# Altium PCB Saleem_PCB.PcbDoc (part 2 of 3)
Units mil, origin at the board's own origin, x right, y up, seen from the top; angles counter-clockwise.
Board outline 2705.54 x 1767 mil, 2 copper layers (Top Layer, Bottom Layer); 91 components, 66 nets, 321 pads, 111 vias.
Unrouted connection lines stored in the file: 1.
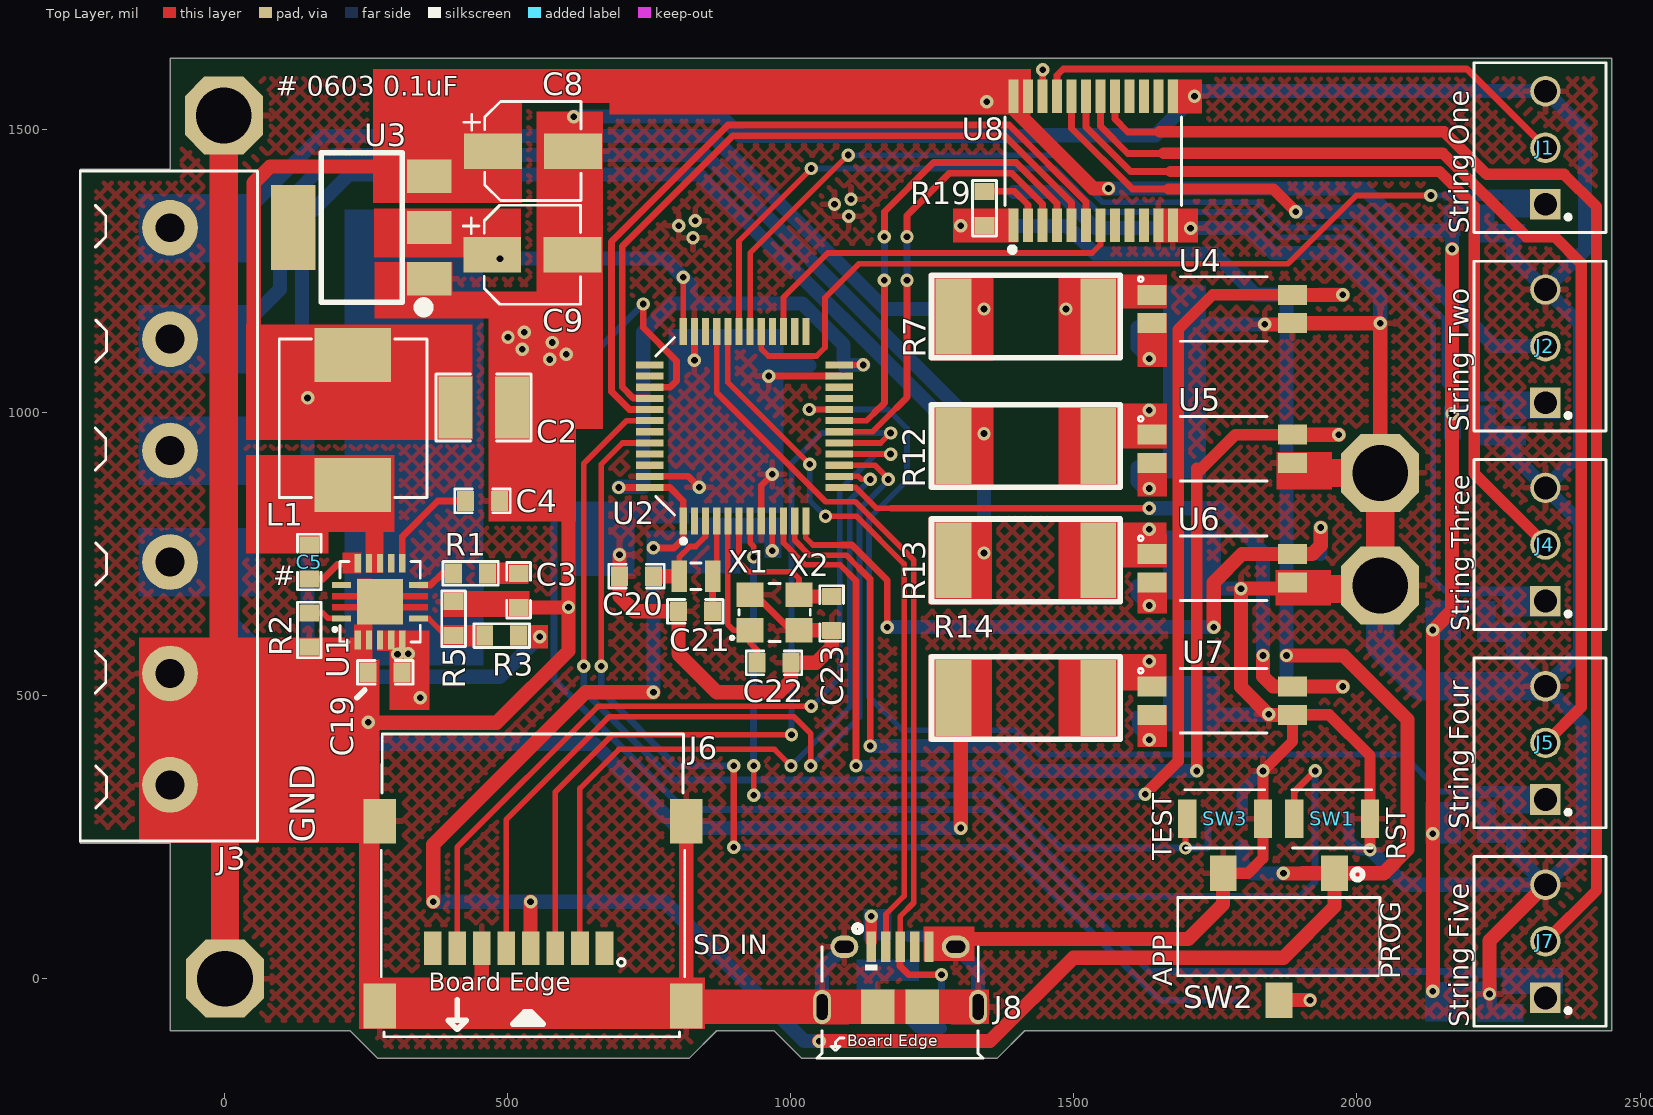
[diagram p0: Top Layer view]

## Part data (continued)
R4 R5 R6 R19 R20: library part RC0603FR-0710KL, "RES SMD 10K OHM 1% 1/10W 0603", Case/Package=0603, Case Code (Metric)=1608, Manufacturer=Yageo, Max Operating Temperature=155°C, Min Operating Temperature=-55°C, Power Rating=100mW, Resistance=10kR, Supplier Part Number 1=311-10.0KHRDKR-ND, Temperature Coefficient=100ppm/°C, Tolerance=1%, Voltage Rating=75V, Voltage Rating (DC)=50V, Case Code (Imperial)=0603, ComponentLink1Description=http://www.farnell.com/datasheets/38590.pdf?src-supplier=Element14, ComponentLink1URL=http://www.farnell.com/datasheets/38590.pdf?src-supplier=Element14, ComponentLink2Description=https://www.verical.com/server-webapp/html/getDatasheet?partID=409289&src-supplier=Verical, ComponentLink2URL=https://www.verical.com/server-webapp/html/getDatasheet?partID=409289&src-supplier=Verical, ComponentLink3Description=http://www.farnell.com/datasheets/1868787.pdf?src-supplier=Element14, ComponentLink3URL=http://www.farnell.com/datasheets/1868787.pdf?src-supplier=Element14, ComponentLink4Description=http://www.farnell.com/datasheets/2167052.pdf?src-supplier=Element14, ComponentLink4URL=http://www.farnell.com/datasheets/2167052.pdf?src-supplier=Element14, ComponentLink5Description=http://www.farnell.com/datasheets/443971.pdf?src-supplier=Element14, ComponentLink5URL=http://www.farnell.com/datasheets/443971.pdf?src-supplier=Element14, Composition="Thick Film", Depth=0.8mm, Height=0.45mm, Lead Free="Lead Free", Lead Pitch=0.3mm, Length=1.6mm, Manufacturer Part Number=RC0603FR-0710KL, Military Standard=Not, Number of Pins=2, Packaging="Tape and Reel", Pricing 1="1=0.1, 10=0.024, 100=0.0097, 1000=0.00437, 2500=0.00379 (USD)", REACH SVHC="No SVHC", Stock 1=144725424, Supplier 1=Digi-Key, Termination=SMD/SMT, Weight=7.1E-05oz, Width=0.8mm
R7 R12 R13 R14: library part 25121WF3900T4E, "Resistors 200V 390O 2512 Chip Resistor SMD", Manufacturer=UNI-ROYAL, Package=2512, ComponentLink1Description=LCSC, ComponentLink1URL=https://lcsc.com/product-detail/Chip-span-style-background-color-ff0-Resistor-span-Surface-Mount_UNI-ROYAL-Uniroyal-Elec-25121WF3900T4E_C60131.html, Manufacturer Part No=25121WF3900T4E
R8 R9 R10 R11: library part RC0603FR-073K3L, "RES SMD 3.3K OHM 1% 1/10W 0603", Case/Package=0603, Manufacturer="Yageo Phycomp", Max Operating Temperature=155°C, Min Operating Temperature=-55°C, Power Rating=100mW, Resistance=3.3kR, Supplier Part Number 1=311-3.30KHRCT-ND, Temperature Coefficient=100ppm/°C, Tolerance=1%, Voltage Rating (DC)=50V, Depth=0.8mm, Height=0.45mm, Lead Free="Lead Free", Length=1.6mm, Manufacturer Part Number=RC0603FR-073K3L, Mount="Surface Mount", Number of Pins=2, Packaging="Cut Tape", Pricing 1="1=0.1, 10=0.024, 100=0.0097, 1000=0.00437, 2500=0.00379 (USD)", REACH SVHC="No SVHC", Stock 1=6863000, Supplier 1=Digi-Key, Width=800um
R15 R16 R17 R18: library part RT0603DRD07200RL, "RES SMD 200 OHM 0.5% 1/10W 0603", Case/Package=0603, Manufacturer=Yageo, Power Rating=100mW, Supplier Part Number 1=311-200DCT-ND, Tolerance=0.5%, Voltage Rating (DC)=50V, Lead Free="Lead Free", Manufacturer Part Number=RT0603DRD07200RL, Packaging="Cut Tape", Pricing 1="1=0.21, 10=0.174, 100=0.0682, 1000=0.02855, 2500=0.02617 (USD)", Resistance=200R, Stock 1=19572, Supplier 1=Digi-Key
R21: library part RC0603FR-0736KL, "RES SMD 36K Ohm 1% 0.1W 0603", Case/Package=0603, Case Code (Metric)=1608, Manufacturer=Yageo, Max Operating Temperature=155°C, Max Power Dissipation=100mW, Min Operating Temperature=-55°C, Package Quantity=1, Resistance=36kR, Resistor Type="Thick Film", Supplier Part Number 1=311-36.0KHRCT-ND, Temperature Coefficient=100ppm/°C, Tolerance=1%, Voltage Rating=75V, Voltage Rating (DC)=50V, Case Code (Imperial)=0603, Category="Chip SMD Resistors", ComponentLink1Description=https://datasheet.ciiva.com/2454/pyu-r-int-thick-7-2454483.pdf?src-supplier=Digi-Key, ComponentLink1URL=https://datasheet.ciiva.com/2454/pyu-r-int-thick-7-2454483.pdf?src-supplier=Digi-Key, ComponentLink2Description=https://datasheet.ciiva.com/2454/pyu-r-int-thick-7-2454484.pdf?src-supplier=Digi-Key, ComponentLink2URL=https://datasheet.ciiva.com/2454/pyu-r-int-thick-7-2454484.pdf?src-supplier=Digi-Key, ComponentLink3Description=https://datasheet.ciiva.com/2454/pyu-r-int-thick-7-2454485.pdf?src-supplier=Digi-Key, ComponentLink3URL=https://datasheet.ciiva.com/2454/pyu-r-int-thick-7-2454485.pdf?src-supplier=Digi-Key, Construction=Rectangular, Depth=0.8mm, Features="Moisture Resistant", Height=0.022inch, Lead Free="Lead Free", Length=1.6mm, Manufacturer Part Number=RC0603FR-0736KL, Military Standard=Not, Mount="Surface Mount", Number of Terminations=2, Packaging="Tape and Reel", Power Rating=100mW, Pricing 1="1=0.10000, 10=0.02400, 100=0.00970, 1000=0.00436, 2500=0.00378 (USD)", RoHS=Yes, RoHS Compliant=Yes, Series=RC, Size Code=0603, Stock 1=463498, Supplier 1=Digi-Key, Termination=SMD/SMT, Weight=7.1E-05oz, Width=0.031inch
R22: library part RC0603FR-071K5L, "RES SMD 1.5K OHM 1% 1/10W 0603"
R23: library part RC0603FR-0710KL, "RES SMD 10K OHM 1% 1/10W 0603", Case Code (Imperial)=0603, Case Code (Metric)=1608, Manufacturer=Yageo, Max Operating Temperature=155°C, Min Operating Temperature=-55°C, Power Rating=100mW, Resistance=10kR, Supplier Part Number 1=311-10.0KHRDKR-ND, Temperature Coefficient=100ppm/°C, Tolerance=1%, Voltage Rating=75V, Voltage Rating (DC)=50V, Case/Package=0603, ComponentLink1Description=http://www.farnell.com/datasheets/38590.pdf?src-supplier=Element14, ComponentLink1URL=http://www.farnell.com/datasheets/38590.pdf?src-supplier=Element14, ComponentLink2Description=https://www.verical.com/server-webapp/html/getDatasheet?partID=409289&src-supplier=Verical, ComponentLink2URL=https://www.verical.com/server-webapp/html/getDatasheet?partID=409289&src-supplier=Verical, ComponentLink3Description=http://www.farnell.com/datasheets/1868787.pdf?src-supplier=Element14, ComponentLink3URL=http://www.farnell.com/datasheets/1868787.pdf?src-supplier=Element14, ComponentLink4Description=http://www.farnell.com/datasheets/2167052.pdf?src-supplier=Element14, ComponentLink4URL=http://www.farnell.com/datasheets/2167052.pdf?src-supplier=Element14, ComponentLink5Description=http://www.farnell.com/datasheets/443971.pdf?src-supplier=Element14, ComponentLink5URL=http://www.farnell.com/datasheets/443971.pdf?src-supplier=Element14, Composition="Thick Film", Depth=0.8mm, Height=0.45mm, Lead Free="Lead Free", Lead Pitch=0.3mm, Length=1.6mm, Manufacturer Part Number=RC0603FR-0710KL, Military Standard=Not, Number of Pins=2, Packaging="Tape and Reel", Pricing 1="1=0.1, 10=0.024, 100=0.0097, 1000=0.00437, 2500=0.00379 (USD)", REACH SVHC="No SVHC", Stock 1=144725424, Supplier 1=Digi-Key, Termination=SMD/SMT, Weight=7.1E-05oz, Width=0.8mm
SW1 SW3: "SWITCH TACTILE SPST-NO 0.05A 12V", Contact Current Rating=50mA, Contact Resistance=100mR, Insulation Resistance=100MR, Manufacturer=Omron, Max Operating Temperature=70°C, Max Voltage Rating (DC)=12V, Min Operating Temperature=-25°C, Operating Force=1.5N, Package Quantity=1, Ratings="Dust Proof,IP40", Supplier Part Number 1=SW1020DKR-ND, Actuator Length=0.4mm, Actuator Type=Standard, ComponentLink1Description=http://www.farnell.com/datasheets/60838.pdf?src-supplier=Farnell, ComponentLink1URL=http://www.farnell.com/datasheets/60838.pdf?src-supplier=Farnell, ComponentLink2Description=http://www.farnell.com/datasheets/60838.pdf?src-supplier=Element14, ComponentLink2URL=http://www.farnell.com/datasheets/60838.pdf?src-supplier=Element14, ComponentLink3Description=https://omronfs.omron.com/en_US/ecb/products/pdf/en-b3u.pdf?src-supplier=Digi-Key, ComponentLink3URL=https://omronfs.omron.com/en_US/ecb/products/pdf/en-b3u.pdf?src-supplier=Digi-Key, ComponentLink4Description=http://www.omron.com/ecb/products/pdf/en-b3u.pdf?src-supplier=Digi-Key, ComponentLink4URL=http://www.omron.com/ecb/products/pdf/en-b3u.pdf?src-supplier=Digi-Key, ComponentLink5Description=https://www.distrelec.biz/Web/Downloads/he/et/B3U_eng_datasheet.pdf?mime=application%2Fpdf&src-supplier=Distrelec, ComponentLink5URL=https://www.distrelec.biz/Web/Downloads/he/et/B3U_eng_datasheet.pdf?mime=application%2Fpdf&src-supplier=Distrelec, ComponentLink6Description=http://www.onlinecomponents.com/productFiles/mf-OM/en-b3u.pdf?src-supplier=Onlinecomponents.com, ComponentLink6URL=http://www.onlinecomponents.com/productFiles/mf-OM/en-b3u.pdf?src-supplier=Onlinecomponents.com, ComponentLink7Description=https://www.verical.com/server-webapp/html/getDatasheet?partID=552554&src-supplier=Verical, ComponentLink7URL=https://www.verical.com/server-webapp/html/getDatasheet?partID=552554&src-supplier=Verical, ComponentLink8Description=http://www.farnell.com/datasheets/1685550.pdf?src-supplier=Element14, ComponentLink8URL=http://www.farnell.com/datasheets/1685550.pdf?src-supplier=Element14, ComponentLink9Description=http://www.farnell.com/datasheets/2610940.pdf?src-supplier=Farnell, ComponentLink9URL=http://www.farnell.com/datasheets/2610940.pdf?src-supplier=Farnell, ComponentLink10Description=https://www.alliedelec.com/m/d/4c8a9ef82804fc3c241a13c1e298fd73.pdf?src-supplier=Allied+Electronics, ComponentLink10URL=https://www.alliedelec.com/m/d/4c8a9ef82804fc3c241a13c1e298fd73.pdf?src-supplier=Allied+Electronics, Contact Material=Silver, Current Rating=50mA, Depth=2.5mm, Electrical Life=200000Cycles, Height=1.2mm, Illumination Type=Non-Illuminated,Illuminated, Lead Free="Lead Free", Length=4mm, Manufacturer Part Number=B3U-1000P, Max Current Rating=50mA, Mechanical Life=200000Cycles, Mount="Surface Mount", Orientation=Straight, Packaging="Tape and Reel", Pricing 1="1=1, 10=0.961, 25=0.9064, 50=0.7976, 100=0.7251, 250=0.68888, 500=0.67074, 1000=0.52571 (USD)", REACH SVHC=Unknown, Stock 1=116454, Supplier 1=Digi-Key, Switch Function=Off-Mom, Switch Travel=0.15mm, Termination=SMD/SMT, Throw Configuration=SPST, Voltage Rating (DC)=12V, Weight=0.000776oz, Width=3mm
SW2: "SPDT 50mA @ 12VDC 12V On-On SMD Toggle Switches RoHS", Contact Rating @ Voltage="50mA @ 12VDC", Manufacturer="XKB Connectivity", Operating Force=200±100gf, Package=SMD, Rated Voltage(DC)=12V, Actuator Orientation=Vertical, Actuator Type=Standard, Circuit=SPDT, Contact Finish=Silver, Contact Material=Brass, Electrical Life Cycles=10000, Mounting Type="Surface Mount", Switch Height=3mm
U1: "IC REG BUCK ADJUSTABLE 6A 14VQFN", Case/Package=QFN, Manufacturer="Texas Instruments", Max Input Voltage=17V, Max Operating Temperature=150°C, Max Output Current=6A, Max Output Voltage=15V, Min Input Voltage=1.6V, Min Operating Temperature=-40°C, Min Output Voltage=800mV, Min Supply Voltage=4.5V, Package Quantity=3000, Quiescent Current=600uA, Supplier Part Number 1=296-28831-1-ND, Switching Frequency=1.6MHz, Category="Voltage Regulators - Switching", ComponentLink1Description=https://datasheet.ciiva.com/2026/tps54620-2026364.pdf?src-supplier=Digi-Key, ComponentLink1URL=https://datasheet.ciiva.com/2026/tps54620-2026364.pdf?src-supplier=Digi-Key, ComponentLink2Description=https://datasheet.ciiva.com/22716/1781687-22716300.pdf?src-supplier=Element14, ComponentLink2URL=https://datasheet.ciiva.com/22716/1781687-22716300.pdf?src-supplier=Element14, ComponentLink3Description=https://datasheet.ciiva.com/2026/tps54620-2026365.pdf?src-supplier=Digi-Key, ComponentLink3URL=https://datasheet.ciiva.com/2026/tps54620-2026365.pdf?src-supplier=Digi-Key, ComponentLink4Description=https://datasheet.ciiva.com/26101/tps54620-26101515.pdf?src-supplier=Avnet+Europe, ComponentLink4URL=https://datasheet.ciiva.com/26101/tps54620-26101515.pdf?src-supplier=Avnet+Europe, ComponentLink5Description=https://datasheet.ciiva.com/3221/tps54620-3221357.pdf?src-supplier=Avnet, ComponentLink5URL=https://datasheet.ciiva.com/3221/tps54620-3221357.pdf?src-supplier=Avnet, ComponentLink6Description=https://datasheet.ciiva.com/2026/tps54620-2026366.pdf?src-supplier=Digi-Key, ComponentLink6URL=https://datasheet.ciiva.com/2026/tps54620-2026366.pdf?src-supplier=Digi-Key, Contact Plating=Gold, Height=0.95mm, Lead Free="Lead Free", Length=3.65mm, Manufacturer Part Number=TPS54620RHLR, Mount="Surface Mount", Number of Outputs=1, Number of Pins=14, Operating Supply Voltage=17V, Output Current=6A, Output Type=Adjustable, Output Voltage=15V, Packaging="Tape and Reel", Pricing 1="1=5.80000, 10=5.20700, 25=4.92280, 100=4.26630, 250=4.04752, 500=3.63182, 1000=3.61200 (USD)", Radiation Hardening=No, REACH SVHC="No SVHC", RoHS=Yes, RoHS Compliant=Yes, Series=SWIFT™, Supplier 1=Digi-Key, Synchronous Rectifier=Yes, Width=3.65mm
U2: Case/Package=LQFP, Frequency=48MHz, Manufacturer=STMicroelectronics, Max Operating Temperature=85°C, Min Operating Temperature=-40°C, Supplier Part Number 1=497-18745-6-ND, Category=Microcontrollers, ComponentLink1Description=http://www.mouser.com/ds/2/389/stm32f070c6-956182.pdf?src-supplier=Mouser, ComponentLink1URL=http://www.mouser.com/ds/2/389/stm32f070c6-956182.pdf?src-supplier=Mouser, ComponentLink2Description=http://www.st.com/content/ccc/resource/technical/document/datasheet/31/4f/10/5f/a5/32/46/42/DM00141386.pdf/files/DM00141386.pdf/jcr:content/translations/en.DM00141386.pdf?src-supplier=Digi-Key, ComponentLink2URL=http://www.st.com/content/ccc/resource/technical/document/datasheet/31/4f/10/5f/a5/32/46/42/DM00141386.pdf/files/DM00141386.pdf/jcr:content/translations/en.DM00141386.pdf?src-supplier=Digi-Key, Core Architecture=ARM, Interface=I2C,SPI,USB,UART,USART, Lead Free="Lead Free", Manufacturer Part Number=STM32F070CBT6TR, Memory Size=128KB, Memory Type=FLASH, Number of I/Os=37, Oscillator Type=Internal, Packaging="Tape and Reel", Peripherals=POR,PWM,WDT,DMA, Pricing 1="1=3.40000, 10=3.05100, 25=2.87800, 100=2.45200, 250=2.30232, 500=2.01452, 1000=1.91860 (USD)", RoHS=Yes, RoHS Compliant=Yes, Supplier 1=Digi-Key
U3: "IC REG LINEAR 3.3V 1A SOT223", Case/Package=SOT-223, Dropout Voltage=1.3V, Manufacturer="ON Semiconductor", Max Input Voltage=18V, Max Operating Temperature=125°C, Max Output Current=1A, Min Current Limit=1.1A, Min Input Voltage=-300mV, Min Operating Temperature=0°C, Min Output Voltage=3.3V, Package Quantity=1, Power Supply Rejection Ratio (PSRR)=60dB, Quiescent Current=700uA, Reference Voltage=1.275V, Supplier Part Number 1=NCP1117LPST33T3GOSCT-ND, Category="Voltage Regulators - Linear", ComponentLink1Description=https://datasheet.ciiva.com/6590/ncp1117lp-d-6590870.pdf?src-supplier=Digi-Key, ComponentLink1URL=https://datasheet.ciiva.com/6590/ncp1117lp-d-6590870.pdf?src-supplier=Digi-Key, ComponentLink2Description=https://datasheet.ciiva.com/16468/ncp1117lp-d-16468566.pdf?src-supplier=Future+Electronics, ComponentLink2URL=https://datasheet.ciiva.com/16468/ncp1117lp-d-16468566.pdf?src-supplier=Future+Electronics, ComponentLink3Description=https://datasheet.ciiva.com/6590/ncp1117lp-d-6590872.pdf?src-supplier=Digi-Key, ComponentLink3URL=https://datasheet.ciiva.com/6590/ncp1117lp-d-6590872.pdf?src-supplier=Digi-Key, ComponentLink4Description=https://datasheet.ciiva.com/6590/ncp1117lp-d-6590873.pdf?src-supplier=Digi-Key, ComponentLink4URL=https://datasheet.ciiva.com/6590/ncp1117lp-d-6590873.pdf?src-supplier=Digi-Key, ComponentLink5Description=https://datasheet.ciiva.com/8233/ncp1117lp-d-8233561.pdf?src-supplier=Avnet, ComponentLink5URL=https://datasheet.ciiva.com/8233/ncp1117lp-d-8233561.pdf?src-supplier=Avnet, ComponentLink6Description=https://datasheet.ciiva.com/8231/ncp1117lp-d-8231034.pdf?src-supplier=Avnet, ComponentLink6URL=https://datasheet.ciiva.com/8231/ncp1117lp-d-8231034.pdf?src-supplier=Avnet, ComponentLink7Description=https://datasheet.ciiva.com/4887/ncp1117lp-d-82673-4887580.pdf?src-supplier=Mouser, ComponentLink7URL=https://datasheet.ciiva.com/4887/ncp1117lp-d-82673-4887580.pdf?src-supplier=Mouser, Contact Plating=Tin,Matte, Halogen Free="Halogen Free", Height=1.69mm, Lead Free="Lead Free", Length=6.7mm, Manufacturer Part Number=NCP1117LPST33T3G, Mount="Surface Mount", Nominal Output Voltage=3.3V, Number of Outputs=1, Number of Pins=3, Number of Regulators=1, Output Current=1A, Output Type=Fixed, Output Voltage=3.3V, Packaging="Tape and Reel", Polarity=Positive, Pricing 1="1=0.44000, 10=0.37400, 25=0.34920, 100=0.27930, 250=0.25932, 500=0.21944, 1000=0.16957 (USD)", REACH SVHC="No SVHC", RoHS=Yes, RoHS Compliant=Yes, Series=-, Stock 1=2017, Supplier 1=Digi-Key, Width=3.7mm
U4 U5 U6 U7: "TransistorOptocouplers DC 1 2500Vrms SOP-4_P1.27 Optocouplers RoHS", Case/Package=SOIC, Collector Emitter Saturation Voltage=300mV, Forward Voltage=1.2V, Manufacturer=CEL, Max Collector Current=30mA, Max Operating Temperature=100°C, Max Output Voltage=80V, Max Power Dissipation=120mW, Min Operating Temperature=-55°C, Package Quantity=1, Supplier Part Number 1=PS2801C-1-F3-ACT-ND, Collector Emitter Voltage (VCEO)=300mV, ComponentLink1Description=http://www.cel.com/pdf/datasheets/PS2801C-1,PS2801C-4.pdf?src-supplier=Digi-Key, ComponentLink1URL=http://www.cel.com/pdf/datasheets/PS2801C-1,PS2801C-4.pdf?src-supplier=Digi-Key, ComponentLink2Description=http://www.cel.com/pdf/datasheets/how_to_order_optos.pdf?src-supplier=Digi-Key, ComponentLink2URL=http://www.cel.com/pdf/datasheets/how_to_order_optos.pdf?src-supplier=Digi-Key, ComponentLink3Description=http://datasheet.iiic.cc/cel/PS2801C-1-F3-A.pdf?src-supplier=IIIC, ComponentLink3URL=http://datasheet.iiic.cc/cel/PS2801C-1-F3-A.pdf?src-supplier=IIIC, Lead Free="Lead Free", Manufacturer Part Number=PS2801C-1-F3-A, Mount="Surface Mount", Number of Channels=1, Number of Pins=4, Output Current per Channel=30mA, Packaging="Tape and Reel", Pricing 1="1=0.77, 10=0.595, 100=0.3825 (USD)", Stock 1=399, Supplier 1=Digi-Key
U8: "IC TRANSLATION TXRX 5.5V 24TSSOP", Case/Package=TSSOP, High Level Output Current=-32mA, Low Level Output Current=32mA, Manufacturer="Texas Instruments", Max Operating Temperature=85°C, Max Supply Voltage=5.5V, Min Operating Temperature=-40°C, Min Supply Voltage=1.65V, Operating Supply Voltage=3.3V, Package Quantity=1, Quiescent Current=15uA, Supplier Part Number 1=296-18593-1-ND, Category="Buffers, Drivers and Transceivers", ComponentLink1Description=https://datasheet.ciiva.com/1899/sn74lvc8t245-ep-1899655.pdf?src-supplier=Digi-Key, ComponentLink1URL=https://datasheet.ciiva.com/1899/sn74lvc8t245-ep-1899655.pdf?src-supplier=Digi-Key, ComponentLink2Description=https://datasheet.ciiva.com/1628/1636538-1628674.pdf?src-supplier=Newark, ComponentLink2URL=https://datasheet.ciiva.com/1628/1636538-1628674.pdf?src-supplier=Newark, ComponentLink3Description=https://datasheet.ciiva.com/15086/getdatasheetpartid-299102-15086582.pdf?src-supplier=Verical, ComponentLink3URL=https://datasheet.ciiva.com/15086/getdatasheetpartid-299102-15086582.pdf?src-supplier=Verical, ComponentLink4Description=https://datasheet.ciiva.com/26868/sn74lvc8t245mpwrep-26868235.pdf?src-supplier=IIIC, ComponentLink4URL=https://datasheet.ciiva.com/26868/sn74lvc8t245mpwrep-26868235.pdf?src-supplier=IIIC, ComponentLink5Description=https://datasheet.ciiva.com/1899/sn74lvc8t245-ep-1899656.pdf?src-supplier=Digi-Key, ComponentLink5URL=https://datasheet.ciiva.com/1899/sn74lvc8t245-ep-1899656.pdf?src-supplier=Digi-Key, ComponentLink6Description=https://datasheet.ciiva.com/1899/sn74lvc8t245-ep-1899657.pdf?src-supplier=Digi-Key, ComponentLink6URL=https://datasheet.ciiva.com/1899/sn74lvc8t245-ep-1899657.pdf?src-supplier=Digi-Key, ComponentLink7Description=https://datasheet.ciiva.com/25972/sn74lvc8t245-ep-25972059.pdf?src-supplier=Avnet+Europe, ComponentLink7URL=https://datasheet.ciiva.com/25972/sn74lvc8t245-ep-25972059.pdf?src-supplier=Avnet+Europe, ComponentLink8Description=https://datasheet.ciiva.com/34301/1048559-34301923.pdf?src-supplier=Jameco, ComponentLink8URL=https://datasheet.ciiva.com/34301/1048559-34301923.pdf?src-supplier=Jameco, ComponentLink9Description=https://datasheet.ciiva.com/15086/getdatasheetpartid-48801-15086005.pdf?src-supplier=Verical, ComponentLink9URL=https://datasheet.ciiva.com/15086/getdatasheetpartid-48801-15086005.pdf?src-supplier=Verical, ComponentLink10Description=https://datasheet.ciiva.com/41455/001017232-da-01-en-ic-bus-8bit-sn74lvc8t245pwr-tssop-24-tid-41455868.pdf?src-supplier=Conrad, ComponentLink10URL=https://datasheet.ciiva.com/41455/001017232-da-01-en-ic-bus-8bit-sn74lvc8t245pwr-tssop-24-tid-41455868.pdf?src-supplier=Conrad, ComponentLink11Description=https://datasheet.ciiva.com/26867/sn74lvc8t245pwr-26867745.pdf?src-supplier=IIIC, ComponentLink11URL=https://datasheet.ciiva.com/26867/sn74lvc8t245pwr-26867745.pdf?src-supplier=IIIC, ComponentLink12Description=https://datasheet.ciiva.com/7795/1763937-7795013.pdf?src-supplier=Element14, ComponentLink12URL=https://datasheet.ciiva.com/7795/1763937-7795013.pdf?src-supplier=Element14, ComponentLink13Description=https://datasheet.ciiva.com/46439/1831204-46439647.pdf?src-supplier=Element14, ComponentLink13URL=https://datasheet.ciiva.com/46439/1831204-46439647.pdf?src-supplier=Element14, ComponentLink14Description=https://datasheet.ciiva.com/1899/sn74lvc8t245-1899396.pdf?src-supplier=Digi-Key, ComponentLink14URL=https://datasheet.ciiva.com/1899/sn74lvc8t245-1899396.pdf?src-supplier=Digi-Key, ComponentLink15Description=https://datasheet.ciiva.com/1899/sn74lvc8t245-1899395.pdf?src-supplier=Digi-Key, ComponentLink15URL=https://datasheet.ciiva.com/1899/sn74lvc8t245-1899395.pdf?src-supplier=Digi-Key, ComponentLink16Description=https://datasheet.ciiva.com/1899/sn74lvc8t245-1899397.pdf?src-supplier=Digi-Key, ComponentLink16URL=https://datasheet.ciiva.com/1899/sn74lvc8t245-1899397.pdf?src-supplier=Digi-Key, ComponentLink17Description=https://datasheet.ciiva.com/25973/sn74lvc8t245-25973803.pdf?src-supplier=Avnet+Europe, ComponentLink17URL=https://datasheet.ciiva.com/25973/sn74lvc8t245-25973803.pdf?src-supplier=Avnet+Europe, Contact Plating=Gold, Data Rate=500Mbps, Direction=Bidirectional, Height=1.05mm, Lead Free="Lead Free", Length=7.9mm, Logic Function=Translator,Transceiver, Manufacturer Part Number=SN74LVC8T245PWR, Mount="Surface Mount", Number of Bits=8, Number of Channels=8, Number of Elements=1, Number of Outputs=8, Number of Pins=24, Packaging="Tape and Reel", Polarity=Non-Inverting, Pricing 1="1=1.26000, 10=1.12600, 25=1.06840, 100=0.87770, 250=0.82044, 500=0.66780, 1000=0.63000 (USD)", Propagation Delay=4.2ns, Radiation Hardening=No, REACH SVHC="No SVHC", RoHS=Yes, Supplier 1=Digi-Key, Turn-On Delay Time=32.2ns, Weight=0.003157oz, Width=4.5mm
U9 U10 U11 U12 U13: "Power Switch Hi Side 2A 4-Pin Thin MLF T/R", Current Rating=2A, Manufacturer=Microchip, Manufacturer Part Number=MIC94082YFTTR, Max Operating Temperature=125°C, Max Supply Voltage=5.5V, Min Operating Temperature=-40°C, Min Supply Voltage=1.7V, On-State Resistance=67mR, On-state Resistance-Max=67MR, Package Quantity=5000, Supplier Part Number 1=576-3342-1-ND, Category="Hot Swap Controllers", ComponentLink1Description=https://datasheet.ciiva.com/1955/mic94080-5-1955731.pdf?src-supplier=Digi-Key, ComponentLink1URL=https://datasheet.ciiva.com/1955/mic94080-5-1955731.pdf?src-supplier=Digi-Key, ComponentLink2Description=https://datasheet.ciiva.com/1955/mic94080-5-1955730.pdf?src-supplier=Digi-Key, ComponentLink2URL=https://datasheet.ciiva.com/1955/mic94080-5-1955730.pdf?src-supplier=Digi-Key, ComponentLink3Description=https://datasheet.ciiva.com/1955/mic94080-5-1955732.pdf?src-supplier=Digi-Key, ComponentLink3URL=https://datasheet.ciiva.com/1955/mic94080-5-1955732.pdf?src-supplier=Digi-Key, ComponentLink4Description=https://datasheet.ciiva.com/16466/mic94080-5-16466430.pdf?src-supplier=Future+Electronics, ComponentLink4URL=https://datasheet.ciiva.com/16466/mic94080-5-16466430.pdf?src-supplier=Future+Electronics, ComponentLink5Description=https://datasheet.ciiva.com/26948/getdatasheetpartid-792432-26948156.pdf?src-supplier=Verical, ComponentLink5URL=https://datasheet.ciiva.com/26948/getdatasheetpartid-792432-26948156.pdf?src-supplier=Verical, Interface=On/Off, Lead Free="Lead Free", Max Output Current=2A, Mount="Surface Mount", Nominal Supply Current=2A, Number of Outputs=1, Number of Pins=4, Output Configuration="High Side", Output Current=2A, Packaging="Tape and Reel", Radiation Hardening=No, Rated Current-Max=2A, REACH SVHC="No SVHC", RoHS=Yes, RoHS Compliant=Yes, Series=-, Supplier 1=Digi-Key, Supply Current=2A, Turn-Off Delay Time=200ns, Turn-On Delay Time=1.5us
X1: library part X1A000061002100, "-40?~85? 32768Hz ?????? ±20ppm 90kO 6pF SMD2012-2P Crystals ROHS", Manufacturer="Seiko Epson", Package=Custom, ComponentLink1Description=LCSC, ComponentLink1URL=https://www.lcsc.com/product-detail/Crystals_Seiko-Epson-X1A000061002100_C255767.html, Manufacturer Part No=X1A000061002100
X2: "12pF -40?~85? ?????? ±20ppm 8000000Hz SMD3225-4P Crystals ROHS", Manufacturer="TAITIEN Elec", ComponentLink1Description=LCSC, ComponentLink1URL=https://www.lcsc.com/product-detail/Crystals_TAITIEN-Elec-XXDCCLNANF-8-000000MHZ_C521664.html, Manufacturer Part No=XXDCCLNANF-8.000000MHZ, Pakage=Custom

## Free pads (board coordinates)
  oct 137.8x137.8 hole 98.43: MH(-2,1525) MH(0,0) MH(2041,694.5) MH(2041,893.5)

## Via types
v1: diameter 23.62, hole 11.81, Top Layer to Bottom Layer, 111 vias

## Nets (pads, with @x,y where several pads share a name; then routed paths per layer and width w, separated by ;. In a path a pad name is that pad's centre, name@x,y a point inside that pad or via, vN(x,y) a via of type N, cw(c..) or ccw(c..) an arc to the next point about the centre after c; other vN are vias at no path point)
#PWM_1: J1.2 U8.21 | length 961.9
  Top Layer w12: U8.21@1470.02,1559.17 1470.02,1596.02 1481,1607 2194,1607 J1.2@2333,1468
#PWM_2: J2.2 U8.20 | length 1053.6
  Top Layer w12: U8.20@1495.61,1559.17 1495.61,1502.39 1603,1395 1667,1395
  Top Layer w20: 1667,1395 1852,1395 v1(1892,1355)
  Bottom Layer w25: v1(1892,1355) 2005,1355 2242.5,1117.5 J2.2@2333,1117.5
#PWM_3: J4.2 U8.19 | length 1448.3
  Top Layer w12: U8.19@1521.2,1559.17 1521.2,1504.54 1599.74,1426 1671,1426
  Top Layer w20: 1671,1426 2145.82,1426 2207,1364.82 2207,893 J4.2@2333,767
#PWM_4: J5.2 U8.18 | length 1876.1
  Top Layer w12: U8.18@1546.8,1559.17 1546.8,1506.2 1595,1458 1658,1458
  Top Layer w20: 1658,1458 2152,1458 2299,1311 2349,1311 2396,1264 2396,479.5 J5.2@2333,416.5
#PWM_5: J7.2 U8.17 | length 2290.5
  Top Layer w12: U8.17@1572.39,1559.17 1572.39,1518.61 1595,1496 1651,1496
  Top Layer w20: 1651,1496 2154.18,1496 2229.18,1421 2366,1421 2423,1364 2423,156 J7.2@2333,66